# EAGLE board Gps_System_v2.00 (EAGLE 9.6.2)
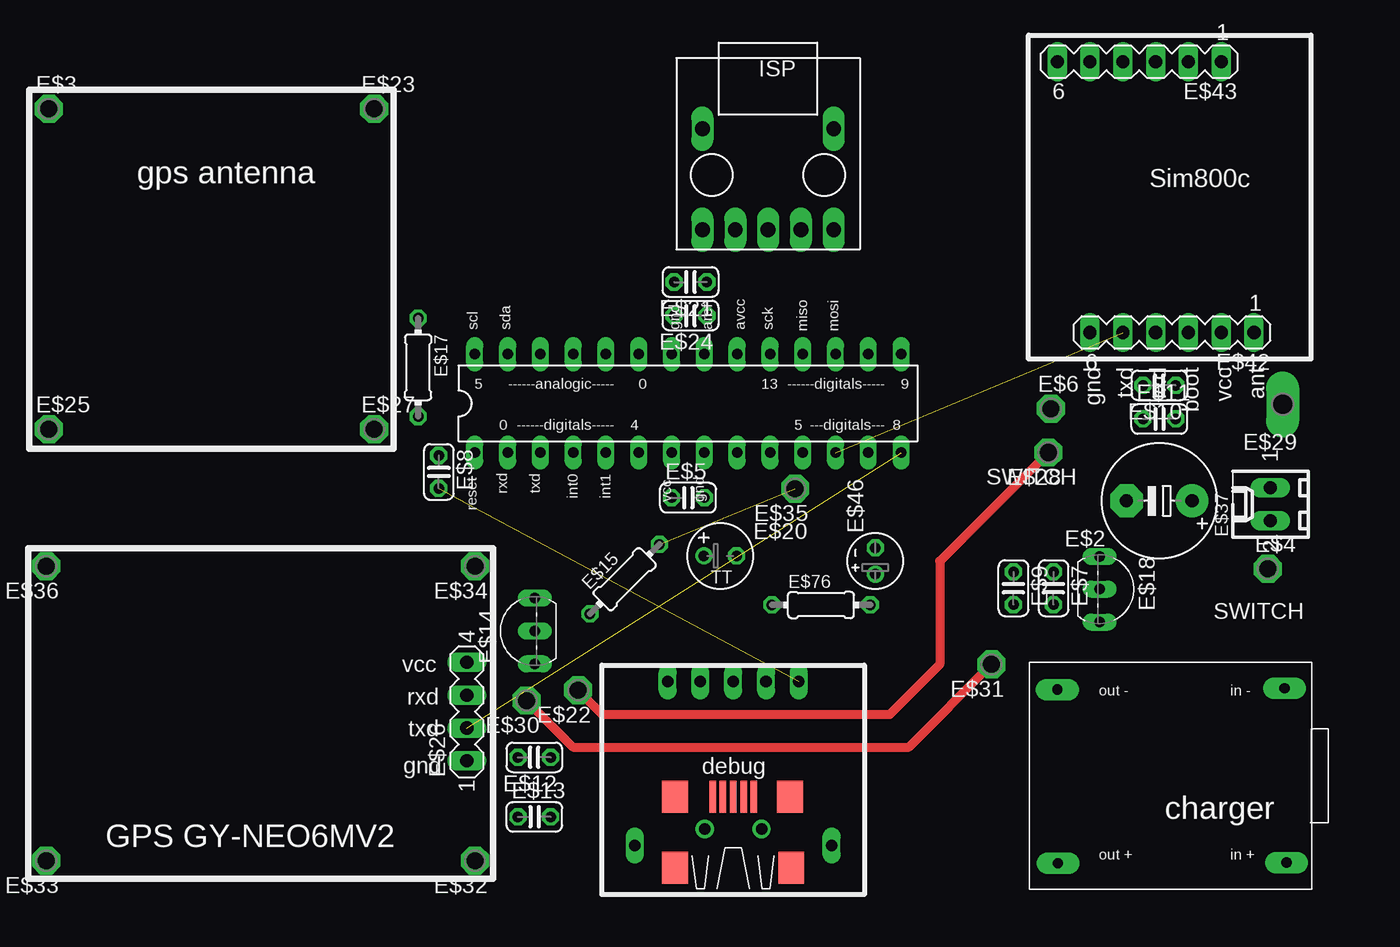
[diagram p0: board, top side]
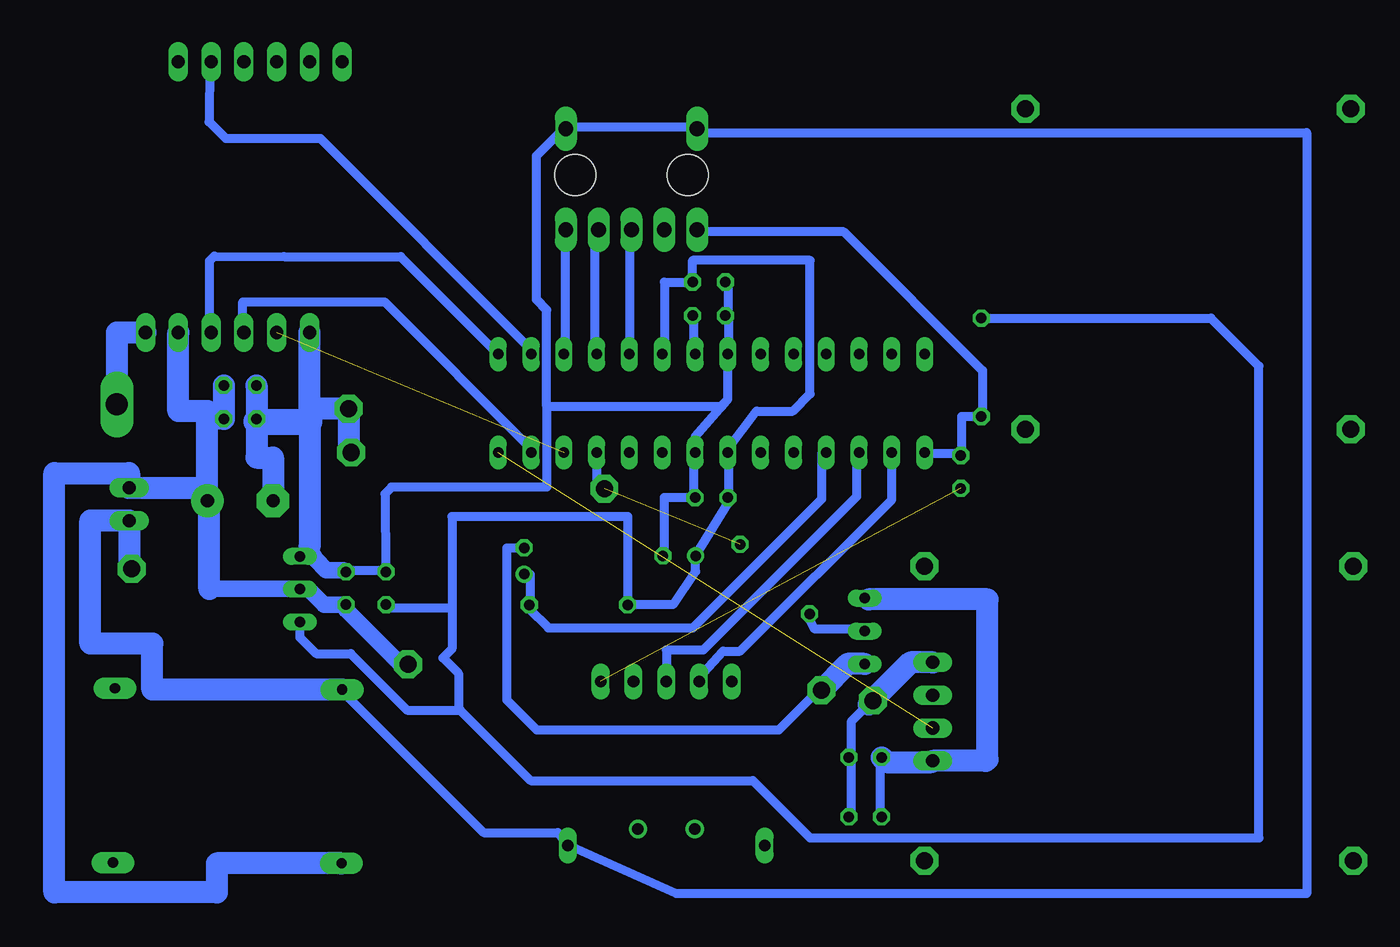
[diagram p1: board, bottom side, seen from below]

No outline drawn. Coordinates in mm, seen from the top.
Copper layers (1*16): Top 0.035mm / dielectric 1.5mm / Bottom 0.035mm
Design rules "default *": minimum track width 0.7mm, minimum drill 24mil, track to track 8mil, track to pad 8mil, pad to pad 8mil, via to via 8mil, smd to smd 8mil, copper to edge 40mil, drill to drill 8mil, minimum pad ring 10mil, minimum via ring 8mil, stop-mask expansion 4mil, vias tented up to drill 0mil, thermal gap 10mil

## Footprints (pad centres in the part's own frame; a part is rotated, then mirrored left to right if it is on the bottom)
USBMINIB = smd 2.5 x 0.5: D+ -3.85,0; D- -3.85,0.8; GND -3.85,-1.6; ID -3.85,-0.8; VBUS -3.85,1.6 | drill 0.9 long: P$1 5.08,0; P$2 5.08,2.54; P$3 5.08,5.08; P$4 5.08,-2.54; P$5 5.08,-5.08; P$6 -7.62,7.62; P$7 -7.62,-7.62 | drill 0.9: P$8 -6.35,2.2; P$9 -6.35,-2.2 | smd 2.5 x 2: P$10 -9.35,-4.5; P$11 -9.35,4.5; P$12 -3.85,-4.4; P$13 -3.85,4.5
E5-8,5 = drill 1.016 pad 2.54: + -2.54,0 | drill 1.016 pad 2.54 octagon: - 2.54,0
P1-13 = drill 1.321 pad 2.159 octagon: TP 0,0
C025-024X044 = drill 0.813 octagon: 1 -1.27,0; 2 1.27,0
TO92- = drill 0.813 long: 1 2.54,0; 2 0,0; 3 -2.54,0
0204/7 = drill 0.813 octagon: 1 -3.81,0; 2 3.81,0
USB-MICRO-PCB = drill 1.143 long: P$1 -5.08,6.35; P$2 -2.54,6.35; P$3 0,6.35; P$4 2.54,6.35; P$5 5.08,6.35; P$6 5.08,-1.47; P$7 -5.08,-1.47 | hole 3.2: -4.34,2.12; 4.36,2.12
ATMEGA328 = drill 0.813 long: 1 -16.51,-3.81; 2 -13.97,-3.81; 3 -11.43,-3.81; 4 -8.89,-3.81; 5 -6.35,-3.81; 6 -3.81,-3.81; 7 -1.27,-3.81; 8 1.27,-3.81; 9 3.81,-3.81; 10 6.35,-3.81; 11 8.89,-3.81; 12 11.43,-3.81; 13 13.97,-3.81; 14 16.51,-3.81; 15 16.51,3.81; 16 13.97,3.81; 17 11.43,3.81; 18 8.89,3.81; 19 6.35,3.81; 20 3.81,3.81; 21 1.27,3.81; 22 -1.27,3.81; 23 -3.81,3.81; 24 -6.35,3.81; 25 -8.89,3.81; 26 -11.43,3.81; 27 -13.97,3.81; 28 -16.51,3.81
TT2D5 = drill 0.813: + -1.27,0 | drill 0.813 octagon: - 1.27,0
MA04-1 = drill 1.016 long: 1 -3.81,0; 2 -1.27,0; 3 1.27,0; 4 3.81,0
P1-17Y = drill 1.702 pad 2.121 long: TP 0,0
6410-02 = drill 1.016 long: 1 1.27,0; 2 -1.27,0
LIPO_CHARGER = drill 0.8 pad 1.676 long: P$5 -8.3,6.85; P$6 9.3,6.95; P$7 -8.25,-6.6; P$8 9.45,-6.55
MA06-1 = drill 1.016 long: 1 -6.35,0; 2 -3.81,0; 3 -1.27,0; 4 1.27,0; 5 3.81,0; 6 6.35,0
E2-4 = drill 0.813 pad 1.27: + -1.016,0 | drill 0.813 pad 1.27 octagon: - 1.016,0

## Placement (x,y rotation side)
E$1  [USBMINIB]  55.4,11.6 90 top
E$2  [E5-8,5]  88.4,30.66 180 top
E$3  [P1-13]  2.4,61 0 top
E$4  [P1-13]  96.8,25.4 0 top
E$5  100nF  [C025-024X044]  51.9,30.9 0 top
E$6  [P1-13]  80,37.8 0 top
E$7  1uF  [C025-024X044]  80.2,23.9 270 top
E$8  0.1uF  [C025-024X044]  32.6,32.9 270 top
E$9  1uF  [C025-024X044]  77.1,23.9 270 top
E$10  100nF  [C025-024X044]  88.4,39.6 180 top
E$11  10uF  [C025-024X044]  88.4,37 0 top
E$12  100nF  [C025-024X044]  40,10.8 180 top
E$13  10uF  [C025-024X044]  40,6.2 0 top
E$14  S9013 h331  [TO92-]  40.04,20.58 90 top
E$15  1k  [0204/7]  47,24.6 45 top
E$16  [USB-MICRO-PCB]  58.1,58 180 top
E$17  10k  [0204/7]  31,41 270 top
E$18  MCP1702  [TO92-]  83.76,23.82 270 top
E$19  [ATMEGA328]  51.9,38.2 0 top
E$20  10uF  [TT2D5]  54.4,26.4 0 top
E$21  100nF  [C025-024X044]  52.1,47.6 180 top
E$22  [P1-13]  43.4,16 180 top
E$23  [P1-13]  27.6,61 0 top
E$24  100nF  [C025-024X044]  52.1,45 180 top
E$25  [P1-13]  2.4,36.2 0 top
E$26  [MA04-1]  34.77,14.34 90 top
E$27  [P1-13]  27.6,36.2 0 top
E$28  [P1-13]  79.8,34.4 180 top
E$29  [P1-17Y]  97.95,38.13 180 top
E$30  [P1-13]  39.4,15.2 180 top
E$31  [P1-13]  75.4,18 180 top
E$32  [P1-13]  35.4,2.8 180 top
E$33  [P1-13]  2.2,2.8 180 top
E$34  [P1-13]  35.4,25.6 180 top
E$35  [P1-13]  60.2,31.6 180 top
E$36  [P1-13]  2.2,25.6 180 top
E$37  [6410-02]  97,30.4 90 top
E$41  [LIPO_CHARGER]  88.8,9.2 0 top
E$42  [MA06-1]  89.38,43.69 180 top
E$43  [MA06-1]  86.84,64.65 180 top
E$46  TILT SENSOR  [E2-4]  66.4,26 90 top
E$76  10k  [0204/7]  62.2,22.6 0 top

## Library data of the parts
E$1 E$16 E$19 E$41 = LSGPackages
E$2 = ref-packages-longpad
E$3 E$4 E$6 E$22 E$23 E$25 E$27-E$36 = testpad
E$5 E$7-E$13 E$21 E$24 E$46 = rcl
E$14 E$18 = transistor-fet
E$15 E$17 E$76 = eagle-ltspice
E$20 = resistor
E$26 E$42 E$43 = con-lstb
E$37 = con-molex

## Nets
GND: E$1.P$7 E$2.- E$4.TP E$5.2 E$6.TP E$7.1 E$9.1 E$10.2 E$11.1 E$14.3 E$16.P$6 E$16.P$7 E$18.3 E$19.8 E$19.22 E$20.- E$21.2 E$22.TP E$24.2 E$28.TP E$37.2 E$41.P$5 E$42.6 E$46.-
S$2: E$12.2 E$13.1 E$14.1 E$26.1
S$3: E$15.2 E$19.11 E$35.TP
S$4: E$19.21 E$24.1
S$5: E$16.P$2 E$19.18
S$8: E$19.12 E$42.5
S$9: E$19.13 E$42.4
S$10: E$19.15 E$42.3
S$11: E$16.P$3 E$19.19
S$12: E$14.2 E$15.1
S$13: E$16.P$1 E$19.17
S$14: E$1.P$2 E$19.2
S$15: E$1.P$1 E$19.3
S$16: E$1.P$5 E$8.2
S$18: E$19.14 E$26.2
S$19: E$19.16 E$43.2
S$20: E$8.1 E$16.P$5 E$17.2 E$19.1
S$21: E$29.TP E$42.1
S$22: E$19.4 E$46.+ E$76.2
VCC3.3V: E$5.1 E$9.2 E$17.1 E$18.1 E$19.7 E$19.20 E$20.+ E$21.1 E$76.1
VCC5.1V: E$2.+ E$7.2 E$10.1 E$11.2 E$12.1 E$13.2 E$18.2 E$26.4 E$30.TP E$31.TP E$37.1 E$41.P$7 E$42.2

## Tracks (layer width: path | path; a pad name or v marks a point on that pad's centre or on a via)
GND
  Top 0.7: E$22.TP 45.28,14.12 67.52,14.12 71.4,18 71.4,26 E$28.TP
  Bottom 0.7: 83.03,36.8 83.03,37.8 | 87.2,36.8 87.16,36.8 87.16,37.03 E$11.1 | E$18.3 83.03,27.09 | 97,25.4 E$4.TP | 80,34.6 E$28.TP | E$46.- 67.74,27.02 67.74,15.22 65.42,12.9 46.71,12.9 43.8,15.81 E$22.TP | 80.39,25.29 E$7.1 79.93,25.29 77.22,25.29 E$9.1 77.15,25.22 77.19,31.2 76.69,31.71 64.66,31.71 64.66,38 | E$41.P$5 80.39,15.81 69.55,4.97 63.8,4.97 E$1.P$7 54.62,0.26 5.81,0.26 5.81,59.16 52.84,59.16 E$16.P$6 53.29,59.61 62.77,59.61 E$16.P$7 63.22,59.16 63.68,59.16 65.48,57.35 65.48,46.26 64.66,45.43 64.66,38 | E$21.2 50.63,47.4 50.63,45.2 E$24.2 50.58,44.76 50.58,42.45 E$19.22 50.63,38.54 50.75,38.4 | E$20.- 55.57,26.5 55.57,30.9 E$5.2 53.29,31.16 53.29,34.32 E$19.8 53.17,35.62 50.98,38.14 50.75,38.4 | 50.75,38.4 51.1,38 64.66,38
  Bottom 1.27: 80.39,25.29 81.74,25.29 82.58,26.12 82.67,26.36 E$18.3
  Bottom 1.7: E$42.6 83.03,37.8 E$6.TP 80,34.6 | E$41.P$5 95.2,16.05 95.2,19.6 100,19.6 100,29.13 E$37.2 97,25.4 | 83.03,36.8 83.03,27.09 | E$10.2 E$11.1 87.13,34 85.86,34 E$2.- | E$14.3 41.36,18.04 E$22.TP
  Bottom 2: 87.16,36.8 83.03,36.8
S$2
  Bottom 0.7: E$13.1 38.84,6.32 38.84,10.39 E$12.2 | 39.74,23.03 E$14.1 | 30.66,10.53 30.52,10.63
  Bottom 1.7: 39.74,23.03 30.52,23.03 30.52,10.63 | 30.66,10.53 E$26.1 34.86,10.44 38.37,10.44 E$12.2
S$3  (1 unrouted)
  Bottom 0.7: E$19.11 60.79,32.19 E$35.TP
S$4
  Bottom 0.7: E$19.21 53.29,42.45 53.29,44.76 E$24.1
S$5
  Bottom 0.7: E$19.18 60.97,42.45 60.97,51.48 E$16.P$2
S$8  (1 unrouted)
S$9
  Bottom 0.7: E$19.13 65.93,34.77 77.22,46.06 88.2,46.06 88.2,43.72 E$42.4
S$10
  Bottom 0.7: E$19.15 68.64,42.45 68.86,42.45 75.97,49.57 85.01,49.57 90.4,49.6 90.77,49.23 90.77,43.8 E$42.3
S$11
  Bottom 0.7: E$19.19 58.26,42.45 58.26,51.48 E$16.P$3
S$12
  Bottom 0.7: E$14.2 40.23,20.77 43.95,20.77 44.45,21.76 E$15.1
S$13
  Bottom 0.7: E$19.17 63.22,42.45 63.22,51.48 E$16.P$1
S$14
  Bottom 0.7: E$19.2 37.93,34.32 37.93,30.76 49.68,19.02 51.01,19.02 52.86,16.95 E$1.P$2
S$15
  Bottom 0.7: E$19.3 40.64,34.32 40.64,31.01 52.53,19.12 55.4,19.12 E$1.P$1
S$16  (1 unrouted)
S$18  (1 unrouted)
S$19
  Bottom 0.7: E$19.16 65.93,42.45 82.2,58.72 89.52,58.72 90.8,60 90.77,64.58 E$43.2
S$20
  Bottom 0.7: E$19.1 35.23,34.32 32.97,34.32 E$8.1 32.52,34.32 32.52,37.19 E$17.2 30.91,37.27 30.91,40.75 41.65,51.48 52.84,51.48 E$16.P$5
S$21
  Bottom 1.7: E$42.1 97.95,43.69 E$29.TP
S$22
  Bottom 0.7: E$46.+ 65.93,24.97 65.93,22.7 E$76.2 66.01,22.31 64.53,20.82 53.34,20.82 43.35,30.81 43.35,34.32 E$19.4
VCC3.3V
  Bottom 0.7: E$19.20 55.55,42.45 55.55,47.6 E$21.1 53.37,49.28 44.26,49.28 44.26,38.94 45.6,37.6 48.4,37.6 50.58,34.72 50.58,34.32 | 50.58,34.32 50.58,31.16 E$5.1 50.58,30.71 50.58,30.53 E$20.+ 53.13,25.2 54.9,22.63 58.38,22.63 E$76.1 58.39,29.46 72,29.46 72,22.4 | 50.58,34.32 E$19.7 | 71.5,14.46 75.47,14.46 79.84,18.82 82.5,18.82 83.76,20.08 E$18.1 | 71.5,14.46 71.36,14.46 65.9,9 48.7,9 44.26,4.57 9.51,4.57 9.51,41.1 13.22,44.81 E$17.1 | 72,22.4 72,19.2 72.7,18.5 71.5,17.3 71.5,14.46 | E$9.2 76.87,22.4 72,22.4
VCC5.1V
  Top 0.7: E$30.TP 43,11.6 69,11.6 E$31.TP
  Bottom 0.7: 91.95,31.67 E$2.+ 90.77,30.26 90.8,30.26 90.8,31.6 | 90.94,37 90.94,37.6 | E$42.2 | E$18.2 83.76,23.84 | E$26.4 36.45,18.15 E$30.TP 39.74,14.9 41.1,13.55 41.1,10.84 E$12.1 41.1,10.39 41.1,6.32 E$13.2 | E$7.2
  Bottom 1.27: 83.76,23.84 90.8,23.84 | E$7.2 80.2,22.23 75.97,18 E$31.TP | E$7.2 81.89,22.63 83.08,23.82 E$18.2
  Bottom 1.7: 91.95,31.67 E$37.1 97,32.8 102.8,32.8 102.8,0.36 90.22,0.36 90.22,2.6 E$41.P$7 | E$2.+ 90.94,37 E$11.2 E$10.1 | 90.94,37.6 93.2,37.6 E$42.2 | 90.8,23.84 90.8,30.26 | E$26.4 36.49,18.15 39.74,14.9

## Text on the board
tPlace: ISP | gps antenna | Sim800c | gnd | txd | rxd | boot | vcc | ant | SWITCH | SWITCH | vcc | reset | rxd | txd | rx | gnd | tx | debug | GPS GY-NEO6MV2 | charger